# Altium PCB AHPR_Power_Management_and_Controls_Board_Unrouted.PcbDoc (part 1 of 2)
Units mil, origin at the board's own origin, x right, y up, seen from the top; angles counter-clockwise.
Board outline 2559.06 x 2204.72 mil, 2 copper layers (Top Layer, Bottom Layer); 89 components, 40 nets, 283 pads, 0 vias.
Unrouted connection lines stored in the file: 127.
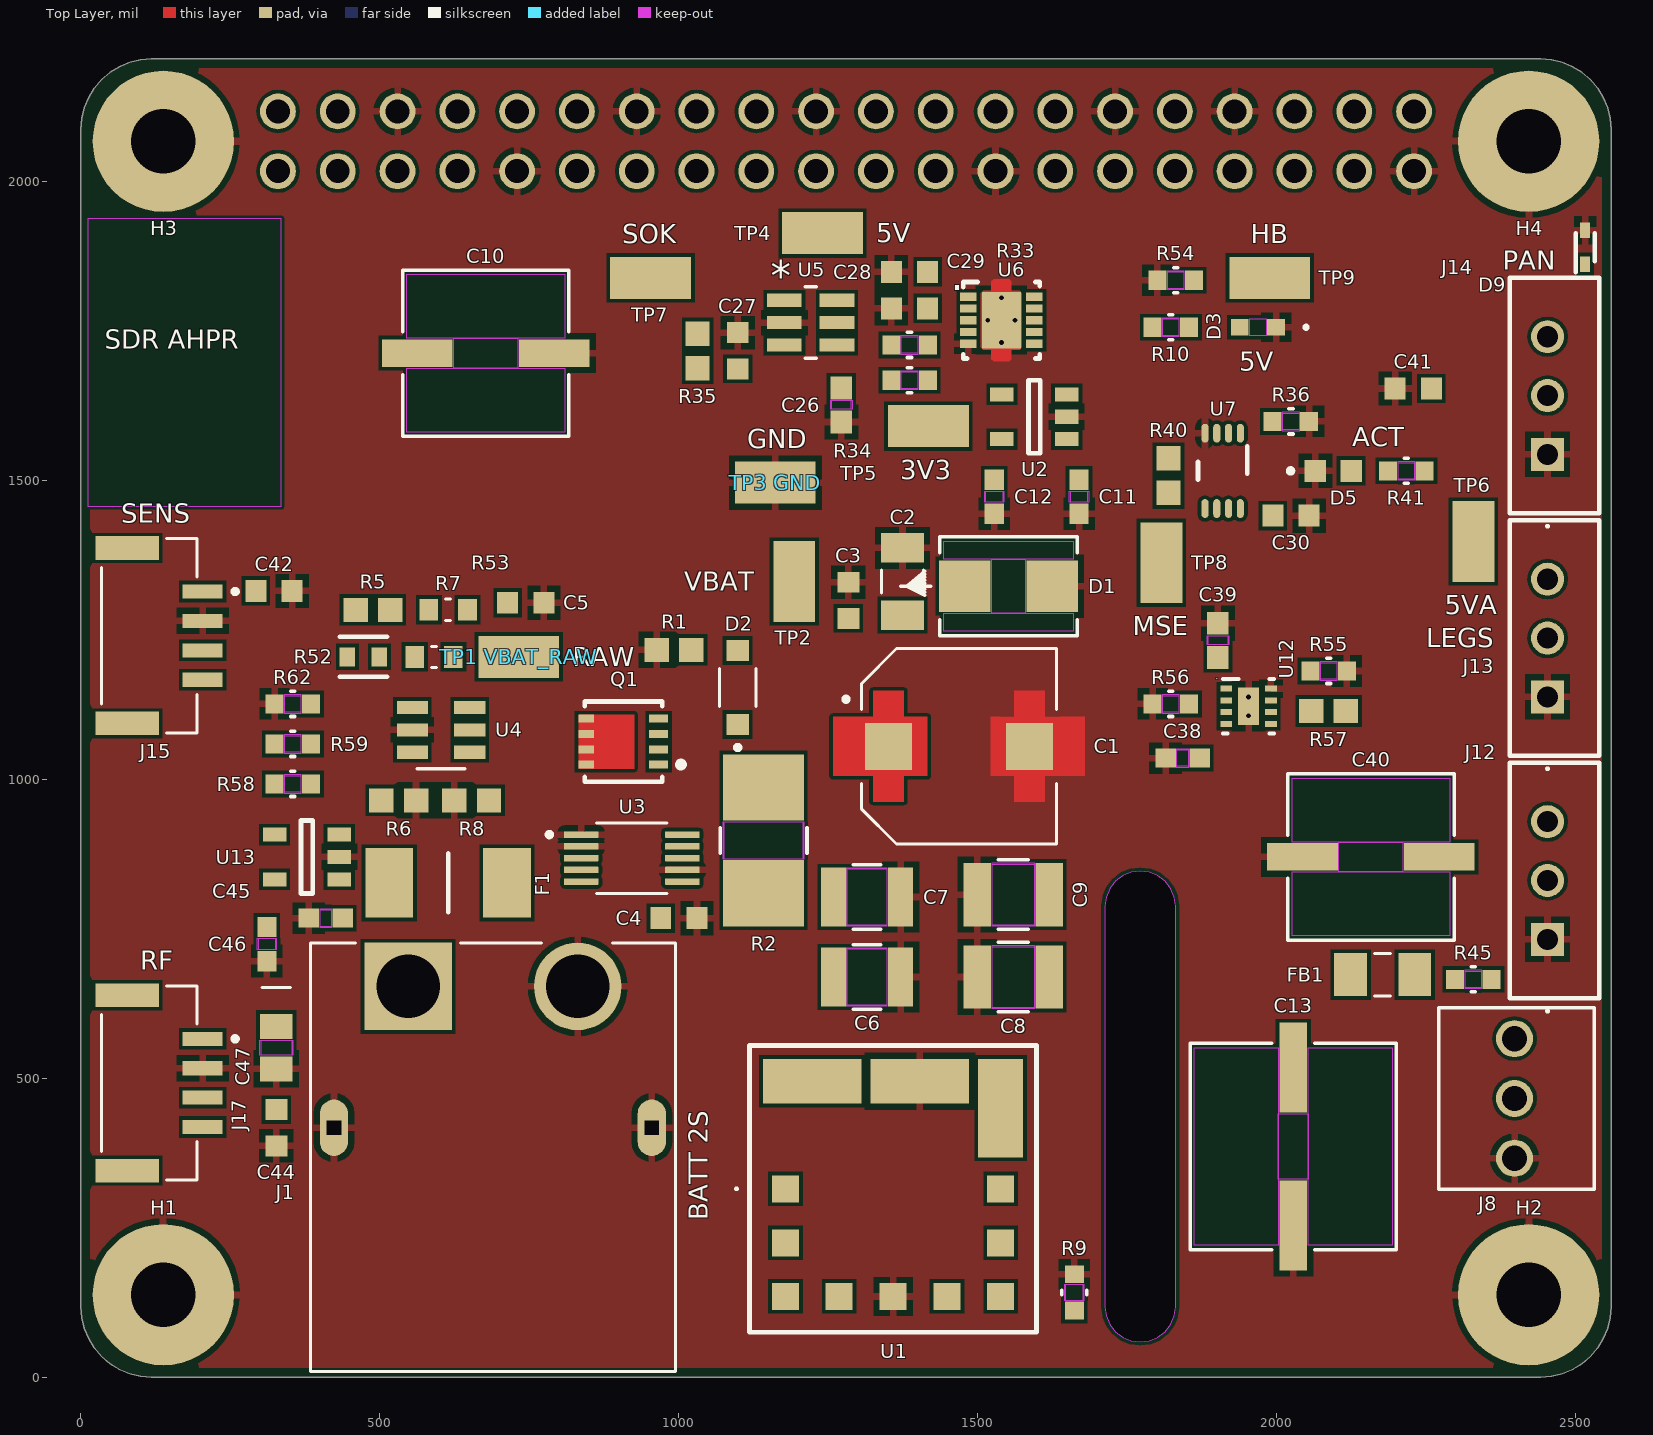
[diagram p0: Top Layer view]
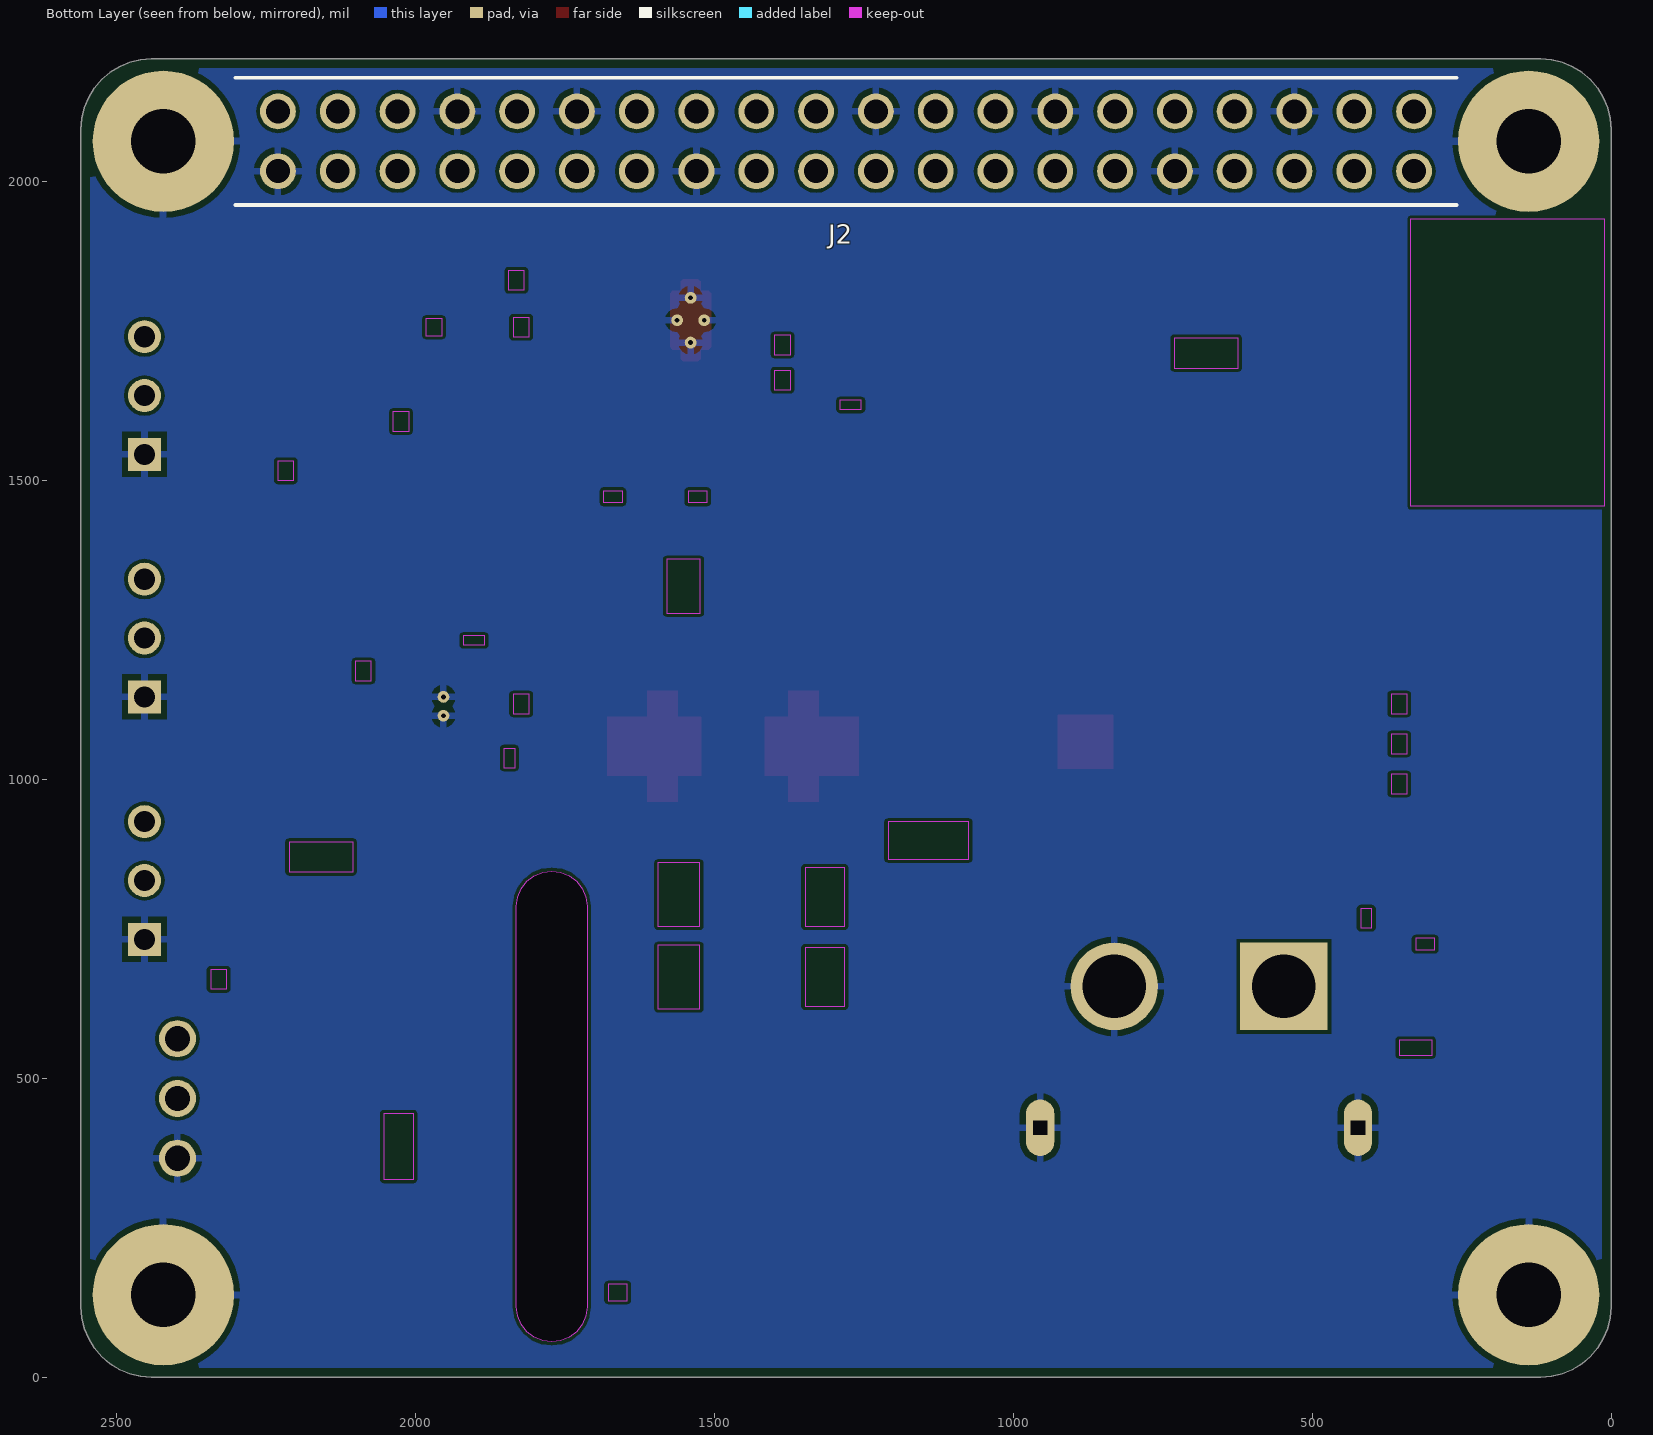
[diagram p1: Bottom Layer view, seen from below]

## Layer stack, top to bottom
Top Solder: solder mask 0.4, Solder Resist, Dk 3.5
Top Layer: signal copper 1.4
Dielectric 1: dielectric 12.6, FR-4, Dk 4.8
Bottom Layer: signal copper 1.4
Bottom Solder: solder mask 0.4, Solder Resist, Dk 3.5

## Board outline
0,118.11 1.45,99.63 5.78,81.61 12.87,64.49 22.56,48.69 34.59,34.59 48.68,22.56 64.49,12.87 81.61,5.78 99.63,1.45 118.11,0 2440.94,0 2459.42,1.45 2477.44,5.78 2494.57,12.87 2510.37,22.56 2524.46,34.59 2536.5,48.69 2546.18,64.49 2553.28,81.61 2557.6,99.63 2559.06,118.11 2559.06,2086.61 2557.6,2105.09 2553.28,2123.11 2546.18,2140.24 2536.5,2156.04 2524.46,2170.13 2510.37,2182.17 2494.57,2191.85 2477.44,2198.94 2459.42,2203.27 2440.94,2204.72 118.11,2204.72 99.63,2203.27 81.61,2198.94 64.49,2191.85 48.68,2182.17 34.59,2170.13 22.56,2156.04 12.87,2140.24 5.78,2123.11 1.45,2105.09 0,2086.61
cut-out: 1712.6,118.11 1714.61,102.83 1720.51,88.58 1729.89,76.35 1742.13,66.97 1756.37,61.07 1771.65,59.06 1786.94,61.07 1801.18,66.97 1813.41,76.35 1822.8,88.58 1828.7,102.83 1830.71,118.11 1830.71,787.4 1828.7,802.69 1822.8,816.93 1813.41,829.16 1801.18,838.54 1786.94,844.44 1771.65,846.46 1756.37,844.44 1742.13,838.54 1729.89,829.16 1720.51,816.93 1714.61,802.69 1712.6,787.4

## Design rules (kind name [scope] priority, off if disabled: settings)
Clearance Clearance_FootprintKeepouts [IsKeepOut And InAnyComponent vs IsPad And InAnyComponent] p1: gap=0.79 ignorepadtopadclearanceinfootprint=FALSE
Clearance [All] p2: gap=5.91 ignorepadtopadclearanceinfootprint=FALSE
HoleSize [All] p1: absolutevalues=TRUE maxlimit=137.8 minlimit=7.87 maxpercent=80.000 minpercent=20.000
MinimumSolderMaskSliver [All] p1: minsoldermaskwidth=4
PolygonConnect [All] p1: connectstyle=Relief reliefconductorwidth=11.81 reliefentries=4 polygonreliefangle="90 Angle" airgapwidth=10
RoutingVias [All] p1: holewidth=11.81 width=23.62 viastyle="Through Hole" minholewidth=11.81 minwidth=23.62 maxholewidth=11.81 maxwidth=23.62
SilkToSilkClearance [All] p1: silktosilkclearance=1.97
SilkToSolderMaskClearance [IsPad] p1: minsilkscreentomaskgap=2 clearancetoexposedcopper=TRUE
SolderMaskExpansion SolderMask_ViasTented [IsVia] p1: expansion=-11.81 istentingtop=FALSE
SolderMaskExpansion [All] p2: expansion=0.79 istentingtop=FALSE
SupplyNets "Schematic Supply Nets_7" [InNet('+5V')] p1: voltage=0.000
SupplyNets "Schematic Supply Nets_6" [InNet('+5V_SERVO')] p2: voltage=0.000
SupplyNets "Schematic Supply Nets_5" [InNet('+3V3_PI')] p3: voltage=0.000
SupplyNets "Schematic Supply Nets_4" [InNet('+5V_ACT')] p4: voltage=0.000
SupplyNets "Schematic Supply Nets_3" [InNet('+3V3_RF')] p5: voltage=0.000
SupplyNets "Schematic Supply Nets_2" [InNet('+3V3_LOGIC')] p6: voltage=0.000
SupplyNets "Schematic Supply Nets_1" [InNet('GND')] p7: voltage=0.000
SupplyNets "Schematic Supply Nets" [InNet('VBAT_PROTECTED')] p8: voltage=0.000
Width Width_POWER_HI [InNetClass('POWER_HI')] p1: maxlimit=118.11 minlimit=9.84 preferedwidth=39.37 minimp=50.000000 maximp=50.000000 favimp=50.000000
Width Width_POWER_LO [InNetClass('POWER_LO')] p2: maxlimit=59.06 minlimit=9.84 preferedwidth=15.75 minimp=50.000000 maximp=50.000000 favimp=50.000000
Width [All] p3: maxlimit=19.68 minlimit=5.91 preferedwidth=7.87 minimp=50.000000 maximp=50.000000 favimp=50.000000
26 further rules are at their usual default settings.

## Classes and differential pairs
net class POWER_LO: +3V3_LOGIC +3V3_PI +3V3_RF
net class POWER_HI: +5V +5V_ACT +5V_SERVO VBAT_IN VBAT_PROTECTED VBAT_RAW VBAT_SNS
component class Safety_Control: C26 C27 C28 C29 C30 R33 R34 R36 R40 R54 TP7 TP8 TP9 U5 U6 U7
component class Pi_Interface_and_IO: C42 C44 C45 C46 C47 H1 H2 H3 H4 J2 J15 J17 R58 R59 R62 U13
component class Battery_Input_and_Protection: C1 C2 C3 C4 C5 D1 D2 F1 J1 Q1 R1 R2 R5 R6 R7 R8 R35 R52 R53 "TP1 VBAT_RAW" TP2 "TP3 GND" U3 U4
component class Actuator_Power_and_Dynamixel_Bus: C13 C38 C39 C40 C41 D5 D9 FB1 J8 J12 J13 J14 R41 R45 R55 R56 R57 TP6 U12
component class 5V_and_3V3_Regulation: C6 C7 C8 C9 C10 C11 C12 D3 R9 R10 TP4 TP5 U1 U2

## Components (designator, comment, footprint, x,y, rotation, side; value= is the part's Value field where it differs from the comment)
C1 "220 µF" CAP_EEEFK1E221GV 1468.5,1055.12 r0 top
C2 "10 µF" CAPC3216X180N 1374.02,1330.71 r90 top
C3 "100 nF" CAPC1608X90N 1283.46,1299.21 r90 top
C4 "100 nF" CAPC1608X90N 1000,767.72 r0 top
C5 "100 nF" CAPC1608X90N 744.09,1295.28 r0 top
C6 "22 uF" G-32_MUR 1314.96,669.29 r0 top
C7 "22 uF" G-32_MUR 1314.96,803.15 r0 top
C8 "22 µF" CAP_GRM32ED_MUR 1559.06,669.29 r0 top
C9 "22 µF" CAP_GRM32ED_MUR 1559.06,807.09 r0 top
C10 "220 µF" CAP_EEFK_D_PAN 677.17,1712.6 r0 top
C11 "1 µF" G-188_MUR 1669.29,1472.44 r270 top
C12 "1 µF" G-188_MUR 1527.56,1472.44 r270 top
C13 "330 µF" CAP_EEFK_E_PAN 2027.56,385.83 r270 top
C26 "47 nF" YAG_CC0603_YAG 1271.65,1625.98 r90 top
C27 "100 nF" CAPC1608X90N 1098.43,1716.54 r270 top
C28 "100 nF" CAPC1608X90N 1385.83,1848.43 r0 top
C29 "DNP" CAPC1608X90N 1385.83,1787.4 r0 top
C30 "100 nF" CAPC1608X90N 2023.62,1440.94 r180 top
C38 "1 µF" G-188_MUR 1842.52,1035.43 r0 top
C39 "47 nF" YAG_CC0603_YAG 1901.57,1232.28 r90 top
C40 "220 µF" CAP_EEFK_D_PAN 2157.48,870.08 r180 top
C41 "100 nF" CAPC1608X90N 2228.35,1653.54 r0 top
C42 "100 nF" CAPC1608X90N 322.83,1314.96 r180 top
C44 "100 nF" CAPC1608X90N 326.77,417.32 r90 top
C45 "1 µF" G-188_MUR 409.45,767.72 r0 top
C46 "1 µF" G-188_MUR 311.02,724.41 r90 top
C47 "10 µF" CAP_GRM21_2p15X1p4X1p4_MUR 326.77,551.18 r90 top
D1 "9.0 V standoff" SMBJSeries_LTF 1551.18,1322.83 r0 top
D2 "12 V zener" DIO_BZT52C12-7-F 1098.43,1153.54 r90 top
D3 "Green LED" LED_LTST-C191KGKT_LTO 1968.5,1755.91 r180 top
D5 "AMBER LED" LEDC1608X55N 2094.49,1515.75 r0 top
D9 "DXL_DATA ESD DIODE" SODFL1608X77N 2515.75,1889.76 r90 top
F1 "5 A slow-blow, 2410" FUSC6127X294N 614.17,826.77 r0 top
FB1 "600 Ω" BEADC3216X180N 2177.17,673.23 r180 top
H1 "MH M2.5" MH_M2.5_PLATED 137.8,137.8 r0 top
H2 "MH M2.5" MH_M2.5_PLATED 2421.26,137.8 r0 top
H3 "MH M2.5" MH_M2.5_PLATED 137.8,2066.93 r0 top
H4 "MH M2.5" MH_M2.5_PLATED 2421.26,2066.93 r0 top
J1 "XT60 male, right-angle THT" AMASS_XT60PW-M 688.98,417.32 r0 top
J2 "Adafruit 1992 2×20 tall female" CONN_PRT-14017_SPK 329.53,2116.93 r0 bottom
J8 "Servo" CONN_A-6373-03A_MOL 2397.64,366.14 r90 top
J12 "DXL_IN from U2D2" B3BEHALFSN 2452.76,732.28 r90 top
J13 "Deployment (XL330 ID 1)" B3BEHALFSN 2452.76,1137.8 r90 top
J14 "Sensor package (XL330 ID 2)" B3BEHALFSN 2452.76,1543.31 r90 top
J15 "4-pin GH Sensor board" JST_SM04B-GHS-TB 129.92,1240.16 r270 top
J17 "4-pin GH RangeFinder" JST_SM04B-GHS-TB 129.92,492.13 r270 top
Q1 "P-ch, −30 V, 8.6 mΩ at −10 V, VGS ±25 V" INF-PG-TSDSON-8-2-V 905.51,1062.99 r180 top
R1 "10 kΩ" RESC1607X60N 992.13,1216.54 r0 top
R2 "10 mΩ" RES_2512_WSL 1141.73,897.64 r270 top
R5 "150 kΩ" RESC1607X60N 488.19,1283.46 r0 top
R6 "10 kΩ" RESC1607X60N 531.5,964.57 r0 top
R7 "210 kΩ" RESC1608X55N 614.17,1283.46 r0 top
R8 "10 kΩ" RESC1607X60N 653.54,964.57 r0 top
R9 "1.30 kΩ" RC0603N_YAG 1661.42,141.73 r90 top
R10 "2.2 kΩ" RC0603N_YAG 1822.83,1755.91 r180 top
R33 "0 Ω" RC0603N_YAG 1385.83,1726.38 r180 top
R34 "0 Ω" RC0603N_YAG 1385.83,1667.32 r180 top
R35 "10 kΩ" RESC1607X60N 1031.5,1716.54 r90 top
R36 "100 kΩ" RC0603N_YAG 2023.62,1598.43 r0 top
R40 "10 kΩ" RESC1607X60N 1818.9,1507.87 r90 top
R41 "1.5 kΩ" RC0603N_YAG 2216.54,1515.75 r180 top
R45 "100 Ω" RC0603N_YAG 2328.74,665.35 r180 top
R52 "20 kΩ" FP-RC0603-0_55-IPC_C 472.44,1204.72 r0 top
R53 "2.2 MΩ" RESC1608X55N 590.55,1204.72 r0 top
R54 "100 kΩ" RC0603N_YAG 1830.71,1834.65 r0 top
R55 "562 Ω" RC0603N_YAG 2086.61,1181.1 r0 top
R56 "100 kΩ" RC0603N_YAG 1822.83,1125.98 r0 top
R57 "10 kΩ" RESC1607X60N 2086.61,1114.17 r0 top
R58 "1 kΩ" RC0603N_YAG 354.33,992.13 r0 top
R59 "1 kΩ" RC0603N_YAG 354.33,1059.06 r0 top
R62 "100 kΩ" RC0603N_YAG 354.33,1125.98 r0 top
"TP1 VBAT_RAW" "5015" KEYSTONE_5015 732.28,1204.72 r0 top
TP2 "5015" KEYSTONE_5015 1192.91,1330.71 r90 top
"TP3 GND" "5015" KEYSTONE_5015 1161.42,1496.06 r0 top
TP4 "+5V" KEYSTONE_5015 1240.16,1913.39 r0 top
TP5 "+3V3_LOGIC" KEYSTONE_5015 1417.32,1590.55 r0 top
TP6 "+5V_ACT" KEYSTONE_5015 2328.74,1397.64 r90 top
TP7 "SAFE_OK" KEYSTONE_5015 952.76,1838.58 r0 top
TP8 "MOTOR_SAFE_EN" KEYSTONE_5015 1807.09,1362.2 r90 top
TP9 "HEARTBEAT" KEYSTONE_5015 1988.19,1838.58 r0 top
U1 "Buck Converter OKL-T_6-W12P-C" OKLT6W12PC 1358.27,314.96 r0 top
U2 "3.3 V 500 mA LDO" DBV0005A_N 1594.49,1606.3 r180 top
U3 "INA226AIDGSR" SOP50P490X110-10N 921.26,868.11 r0 top
U4 "TPS3700DDCR" DDC6_TEX 602.36,1082.68 r0 top
U5 "TPS3808G33DBVR_Supervisor" DBV6 1220.47,1763.78 r0 top
U6 "TPS3430WDRCR_Watchdog" DRC0010J 1539.37,1767.72 r0 top
U7 "SN74LVC1G74DCUR_Dflip-flop" DCU0008A_N 1909.45,1515.75 r270 top
U12 "TPS259530DSGR" DSG0008A 1952.76,1122.05 r0 top
U13 "3.3 V 500 mA LDO" DBV0005A_N 377.95,870.08 r180 top

## Footprints (in the part's own frame and the unit in brackets; to place one, negate y for a bottom-side part, rotate by r counter-clockwise, add the part's x,y. Pads: shape width x height; smd on the part's side, far side on the other; paste and mask are expansions set on the pad)
AMASS_XT60PW-M [mm]
  rect 3.716x3.716 / inner round 3.716 / far side rect 3.716x3.716 hole 2.7 mask+0.102: 1(-3.6,6)
  round 3.716 hole 2.7 mask+0.102: 2(3.6,6)
  oval 1.2x2.4 hole 0.6 square mask+0.102: SH1(-6.75,0) SH2(6.75,0)
  silkscreen extent -9.8,-10.35 7.75,7.85, body extent -7.75,-10.35 7.75,7.85, height 8.4
B3BEHALFSN [mm]
  rect 1.4x1.4 hole 0.9: 1(0,0)
  round 1.4 hole 0.9: 2(2.5,0) 3(5,0)
  silkscreen extent -3.1,-2.2 7.5,1.6, body extent -2.46,-2.29 7.54,1.51, height 6.1
BEADC3216X180N [mm]
  rect 1.4x1.82 smd: 1(-1.36,0) 2(1.36,0)
  silkscreen extent -0.34,-0.9 0.34,0.9, body extent -1.6,-0.84 1.6,0.76, height 1.61
CAP_EEEFK1E221GV [mm]
  rect 2x2 smd paste-2 mask+0: 1(-3,0) 2(3,0)
  Top Layer region: -2.35,1.25 -1.35,1.25 -1.35,-1.25 -2.35,-1.25 -2.35,-2.35 -3.65,-2.35 -3.65,-1.25 -5.35,-1.25 -5.35,1.25 -3.65,1.25 -3.65,2.35 -2.35,2.35
  Top Layer region: 3.65,1.25 5.35,1.25 5.35,-1.25 3.65,-1.25 3.65,-2.35 2.35,-2.35 2.35,-1.25 1.35,-1.25 1.35,1.25 2.35,1.25 2.35,2.35 3.65,2.35
  silkscreen extent -4.9,-4.15 4.15,4.15, body extent -4.85,-4.15 4.85,4.15, height 10.5
CAP_EEFK_D_PAN [mil]
  rect 118x46 smd paste+0 mask+0: 1(-114.5,0) 2(114.5,0)
  Top Layer keep-out region: -53.5,-25 -53.5,25 53.5,25 53.5,-25
  Top Layer keep-out region: -132,25 -132,132 132,132 132,25
  Top Layer keep-out region: -132,-132 -132,-25 132,-25 132,-132
  Keep-Out Layer region: -53.5,-25 -53.5,25 53.5,25 53.5,-25
  silkscreen extent -139,-139 139,139, body extent -154,-134 154,134, height 242
CAP_EEFK_E_PAN [mil]
  rect 150x46 smd paste+0 mask+0: 1(-132,0) 2(132,0)
  Top Layer keep-out region: -55,-25 -55,25 55,25 55,-25
  Top Layer keep-out region: -165.5,25 -165.5,165.5 165.5,165.5 165.5,25
  Top Layer keep-out region: -165.5,-165.5 -165.5,-25 165.5,-25 165.5,-165.5
  Keep-Out Layer region: -55,-25 -55,25 55,25 55,-25
  silkscreen extent -173,-173 173,173, body extent -187,-167 187,167, height 258
CAP_GRM21_2p15X1p4X1p4_MUR [mil]
  rect 42x55 smd paste+0 mask+0: 1(-35.5,0) 2(35.5,0)
  Top Layer keep-out region: -12.5,-25.5 -12.5,25.5 12.5,25.5 12.5,-25.5
  Keep-Out Layer region: -12.5,-27.5 -12.5,27.5 12.5,27.5 12.5,-27.5
  body extent -43,-27 43,27, height 55
CAP_GRM32ED_MUR [mil]
  rect 46x106 smd paste+0 mask+0: 1(-60,0) 2(60,0)
  Top Layer keep-out region: -35,-51 -35,51 35,51 35,-51
  Keep-Out Layer region: -35,-53 -35,53 35,53 35,-53
  silkscreen extent -25,-58 25,58, body extent -69,-53 69,53, height 106
CAPC1608X90N [mm]
  rect 0.89x0.93 smd: 1(-0.77,0) 2(0.77,0)
  body extent -0.8,-0.4 0.8,0.4, height 0.9
CAPC3216X180N [mm]
  rect 1.25x1.82 smd: 1(-1.43,0) 2(1.43,0)
  silkscreen extent -0.48,-0.9 0.48,0.9, body extent -1.6,-0.8 1.6,0.8, height 1.8
CONN_A-6373-03A_MOL [mil]
  round 62 / inner round 60 / far side round 62 hole 42 paste-99999 mask+0: 1(0,0) 2(100,0) 3(200,0)
  silkscreen extent -52,-133 252,127, body extent -47,-128 247,122, height 358
CONN_PRT-14017_SPK [mil]
  round 60 hole 40 paste-99999 mask+0: 1(0,100) 2(0,0) 3(100,100) 4(100,0) 5(200,100) 6(200,0) 7(300,100) 8(300,0) 9(400,100) 10(400,0) 11(500,100) 12(500,0) 13(600,100) 14(600,0) 15(700,100) 16(700,0) 17(800,100) 18(800,0) 19(900,100) 20(900,0) 21(1000,100) 22(1000,0) 23(1100,100) 24(1100,0) 25(1200,100) 26(1200,0) 27(1300,100) 28(1300,0) 29(1400,100) 30(1400,0) 31(1500,100) 32(1500,0) 33(1600,100) 34(1600,0) 35(1700,100) 36(1700,0) 37(1800,100) 38(1800,0) 39(1900,100) 40(1900,0)
  silkscreen extent -71,-56 1971,156, body extent -50,-48 1950,148, height 541
DBV0005A_N [mm]
  rect 1x0.6 smd paste+0 mask+0.051: 1(-1.375,0.95) 2(-1.375,0) 3(-1.375,-0.95) 4(1.375,-0.95) 5(1.375,0.95)
  silkscreen extent -0.25,-1.55 0.25,1.55
DBV6 [mil]
  rect 58x22 smd paste-29 mask-29: 1(-44,37.4) 2(-44,0) 3(-44,-37.4) 4(44,-37.4) 5(44,0) 6(44,37.4)
  silkscreen extent -9,-60 9,60, body extent -59,-60 59,60, height 57
DCU0008A_N [mm]
  oval 0.8x0.3 smd paste+0 mask+0.02: 1(-1.6,0.75) 2(-1.6,0.25) 3(-1.6,-0.25) 4(-1.6,-0.75) 5(1.6,-0.75) 6(1.6,-0.25) 7(1.6,0.25) 8(1.6,0.75)
  silkscreen extent -1.05,-1.05 0.38,1.05
DDC6_TEX [mil]
  rect 52x22 smd paste+0 mask+0: 1(-48,37.4) 2(-48,0) 3(-48,-37.4) 4(48,-37.4) 5(48,0) 6(48,37.4)
  silkscreen extent -40,-65 40,-65, body extent -60,-60 60,60, height 67
DIO_BZT52C12-7-F [mm]
  rect 0.9x0.95 smd paste+0 mask+0.102: 1(-1.575,0) 2(1.575,0)
  silkscreen extent -2.65,-0.77 0.81,0.77, body extent -1.85,-0.77 1.85,0.77, height 1.35
DRC0010J [mm]
  rect 0.7x0.35 smd paste-0.05 mask-0.051: 1(-1.4,1) 2(-1.4,0.5) 3(-1.4,0) 4(-1.4,-0.5) 5(-1.4,-1) 6(1.4,-1) 7(1.4,-0.5) 8(1.4,0) 9(1.4,0.5) 10(1.4,1)
  round 0.5 hole 0.203 paste-2539.97 mask+0: 11(-0.575,0) 11(0,-0.95) 11(0,0.95) 11(0.575,0)
  rect 1.65x2.4 smd paste-1.187 mask-1.181: 11(0,0)
  Top Layer region: -0.875,-1.15 -0.775,-1.25 -0.425,-1.25 -0.425,-1.65 -0.325,-1.75 -0.325,-1.75 -0.175,-1.75 -0.175,-1.75 -0.075,-1.65 -0.075,-1.25 0.075,-1.25 0.075,-1.65 0.175,-1.75 0.175,-1.75 0.325,-1.75 0.325,-1.75 0.425,-1.65 0.425,-1.25 0.775,-1.25 0.875,-1.15 0.875,1.15 0.775,1.25 0.425,1.25 0.425,1.65 0.325,1.75 0.175,1.75 0.075,1.65 0.075,1.25 -0.075,1.25 -0.075,1.65 -0.175,1.75 -0.325,1.75 -0.425,1.65 -0.425,1.25 -0.775,1.25 -0.875,1.15
  Top Layer region: -0.25,-1.1 -0.25,-1.75 0.25,-1.75 0.25,-1.1
  Top Layer region: -0.25,1.75 -0.25,1.1 0.25,1.1 0.25,1.75
  silkscreen extent -1.63,-1.63 1.63,1.63, body extent -1.5,-1.5 1.5,1.5, height 1
DSG0008A [mm]
  rect 0.5x0.25 smd paste+0 mask+0.051: 1(-0.95,0.75) 2(-0.95,0.25) 3(-0.95,-0.25) 4(-0.95,-0.75) 5(0.95,-0.75) 6(0.95,-0.25) 7(0.95,0.25) 8(0.95,0.75)
  round 0.5 / inner round 1.524 / far side round 0.5 hole 0.203 paste-2539.97 mask+0.076: 9(0,-0.4) 9(0,0.4)
  rect 0.9x1.6 smd paste-0.45 mask+0.051: 9(0,0)
  silkscreen extent -1.07,-1.15 1.07,1.15, body extent -1,-1 1,1, height 0.77
FP-RC0603-0_55-IPC_C [mil]
  rect 25.93x31.97 smd paste+0 mask+0: 1(-26.64,0) 2(26.64,0)
  silkscreen extent -40,-33 40,33, body extent -44,-22 44,22, height 10
FUSC6127X294N [mm]
  rect 2.02x2.95 smd: 1(-2.5,0) 2(2.5,0)
  silkscreen extent 0,-1.24 0,1.24, body extent -3.05,-1.35 3.05,1.35, height 2.94
G-32_MUR [mil]
  rect 42x98 smd paste+0 mask+0: 1(-56,0) 2(56,0)
  Top Layer keep-out region: -33,-47 -33,47 33,47 33,-47
  Keep-Out Layer region: -33,-49 -33,49 33,49 33,-49
  silkscreen extent -23,-54 23,54, body extent -63,-49 63,49, height 110
G-188_MUR [mil]
  rect 34x32 smd paste+0 mask+0: 1(-28.5,0) 2(28.5,0)
  Top Layer keep-out region: -9.5,-14 -9.5,14 9.5,14 9.5,-14
  Keep-Out Layer region: -9.5,-16 -9.5,16 9.5,16 9.5,-16
  body extent -31,-16 31,16, height 35
INF-PG-TSDSON-8-2-V [mm] "SON, SMD, 0.65 mm pitch, 8 pin, 3.3 mm L X 3.3 mm W X 1.10 mm H body"
  rect 0.8x0.34 smd paste-0.17 mask+0: 1(-1.537,0.975) 2(-1.537,0.325) 3(-1.537,-0.325) 4(-1.537,-0.975)
  rect 0.65x0.34 smd paste-0.17 mask+0.1: 5(1.538,-0.975) 6(1.538,-0.325) 7(1.538,0.325) 8(1.538,0.975)
  Top Layer region: 1.862,1.145 -0.498,1.145 -0.498,-1.145 1.862,-1.145
  silkscreen extent -2.61,-1.7 1.6,1.7, body extent -1.69,-1.65 1.61,1.65, height 1.01
JST_SM04B-GHS-TB [mm]
  rect 0.6x1.7 smd paste+0 mask+0.102: 1(-1.875,1.875) 2(-0.625,1.875) 3(0.625,1.875) 4(1.875,1.875)
  rect 1x2.7 smd paste+0 mask+0.102: MP1(-3.725,-1.325) MP2(3.725,-1.325)
  silkscreen extent -4.13,-2.42 4.13,3.35, body extent -4.13,-2.05 4.13,2.8, height 4.25
KEYSTONE_5015 [mm]
  rect 3.43x1.78 smd: TP(0,0)
  body extent -1.33,-0.51 1.33,0.51, height 1.52
LED_LTST-C191KGKT_LTO [mil]
  rect 30x28 smd paste+0 mask+0: 1(-30.5,0) 2(30.5,0)
  Top Layer keep-out region: -13.5,-14 -13.5,14 13.5,14 13.5,-14
  Keep-Out Layer region: -13.5,-14 -13.5,14 13.5,14 13.5,-14
  silkscreen extent -84,-3 -78,3, body extent -31,-16 31,16, height 22
LEDC1608X55N [mm]
  rect 0.91x0.93 smd: A(0.76,0) C(-0.76,0)
  silkscreen extent -1.91,-0.1 -1.72,0.1, body extent -0.8,-0.4 0.8,0.4, height 0.8
MH_M2.5_PLATED [mm]
  round 6 hole 2.75: 1(0,0)
OKLT6W12PC [mm]
  rect 1.145x1.145 smd: 1(-4.57,0) 5(4.57,0) 6(4.57,-4.57) 7(0,-4.57) 8(-2.29,-4.57) 9(-4.57,-4.57) 10(-4.57,-2.29) 11(4.57,-2.29) 12(2.29,-4.57)
  rect 4.19x1.905 smd: 2(-3.43,4.57) 3(1.14,4.57)
  rect 1.905x4.19 smd: 4(4.57,3.43)
  silkscreen extent -6.7,-6.09 6.09,6.09, body extent -6.09,-6.22 6.09,5.97, height 7.3
RC0603N_YAG [mil]
  rect 30x32 smd paste+0 mask+0: 1(-30.5,0) 2(30.5,0)
  Top Layer keep-out region: -13.5,-14 -13.5,14 13.5,14 13.5,-14
  Keep-Out Layer region: -13.5,-16 -13.5,16 13.5,16 13.5,-16
  silkscreen extent -3,-21 3,21, body extent -31,-16 31,16, height 28
RES_2512_WSL [mil]
  rect 110.78x135 smd paste+0 mask+0: 1(-88.39,0) 2(88.39,0)
  Top Layer keep-out region: -31,-65.5 -31,65.5 31,65.5 31,-65.5
  Keep-Out Layer region: -31,-67.5 -31,67.5 31,67.5 31,-67.5
  silkscreen extent -21,-72 21,72, body extent -130,-67 130,67, height 35
RESC1607X60N [mm]
  rect 1.04x1.02 smd: 1(-0.735,0) 2(0.735,0)
  body extent -0.8,-0.4 0.8,0.4, height 0.55
RESC1608X55N [mm]
  rect 0.79x0.93 smd: 1(-0.82,0) 2(0.82,0)
  silkscreen extent -0.11,-0.45 0.11,0.45, body extent -0.8,-0.4 0.8,0.4, height 0.55
SMBJSeries_LTF [mil]
  rect 86x86 smd paste+0 mask+0: 1(-73,0) 2(73,0)
  Top Layer keep-out region: -28,-45 -28,45 28,45 28,-45
  Top Layer keep-out region: -108,45 -108,75.5 108,75.5 108,45
  Top Layer keep-out region: -108,-75.5 -108,-45 108,-45 108,-75.5
  Keep-Out Layer region: -28,-45 -28,45 28,45 28,-45
  silkscreen extent -180,-82 115,82, body extent -110,-77 110,77, height 98
SODFL1608X77N [mm]
  rect 0.67x0.42 smd: 1(-0.725,0) 2(0.725,0)
  silkscreen extent -1.06,-0.4 0.6,0.4, body extent -0.8,-0.4 0.8,0.4, height 0.77
SOP50P490X110-10N [mm]
  rrect25% 1.47x0.28 smd: 1(-2.15,1) 2(-2.15,0.5) 3(-2.15,0) 4(-2.15,-0.5) 5(-2.15,-1) 6(2.15,-1) 7(2.15,-0.5) 8(2.15,0) 9(2.15,0.5) 10(2.15,1)
  silkscreen extent -3.6,-1.5 1.5,1.5, body extent -2.45,-1.5 2.45,1.5, height 1.1
YAG_CC0603_YAG [mil]
  rect 38x36 smd paste+0 mask+0: 1(-28.5,0) 2(28.5,0)
  Top Layer keep-out region: -7.5,-16 -7.5,16 7.5,16 7.5,-16
  Keep-Out Layer region: -7.5,-18 -7.5,18 7.5,18 7.5,-18
  body extent -34,-18 34,18, height 36

## Part data
C1: library part EEEFK1E221GV, "CAP ALUM 220UF 20% 25V SMD /  / EEEFK1E221GV /  / 220 µF 25 V, 160 mΩ ESR, SMD can /  / https://www.digikey.it/en/products/detail/panasonic-industry/EEE-FK1E221GV/10291405 /  / EEEFK1E221GV 220 µF 25 V, 160 mΩ ESR, SMD can", Package="RADIAL-2 Panasonic", Availability="In Stock", Check_prices=https://www.snapeda.com/parts/EEEFK1E221GV/Panasonic/view-part/?ref=eda, MF=Panasonic, MP=EEEFK1E221GV, Price=None, Purchase-URL=https://pricing.snapeda.com/search/part/EEEFK1E221GV/?ref=eda, SnapEDA_Link=https://www.snapeda.com/parts/EEEFK1E221GV/Panasonic/view-part/?ref=snap
C2: library part GRM31CR71E106KA12L, "SMD capacitor X7R(EIA) with capacitance 10uF Tol.10%. Rated voltage 25Vdc 125C /  / 10 µF 25 V X7R 1206 /  / GRM31CR71E106KA12L /  / https://octopart.com/part/murata/GRM31CR71E106KA12L?slid=404c199c-e740-4f3a-ac3d-8ed7f0d5c56c&ssid=37a7cfac-85e6-4eb9-ad27-42d001a336a3#CadModels", Package="1206 Murata", Check_prices=https://www.snapeda.com/parts/GRM31CR71E106KA12L/Murata+Electronics+North+America/view-part/?ref=eda, MF="Murata Electronics", MP=GRM31CR71E106KA12L, SnapEDA_Link=https://www.snapeda.com/parts/GRM31CR71E106KA12L/Murata+Electronics+North+America/view-part/?ref=snap
C3: library part GRM188R71H104KA93D, "SMD Capacitor X7R(EIA) with Capacitance: 0.10uF Tol. 10%. Rated Voltage: 50Vdc /  / 100 nF 50 V X7R 0603 /  / GRM188R71H104KA93D /  / https://octopart.com/part/murata/GRM188R71H104KA93D?slid=b13dff97-c438-4242-af73-a6dd7cbdd469&ssid=f8334882-7657-41cd-b7d6-fdf9f837711d#CadModels", Package="1608 Murata", Check_prices=https://www.snapeda.com/parts/GRM188R71H104KA93D/Murata/view-part/?ref=eda, MF=Murata, MP=GRM188R71H104KA93D, SnapEDA_Link=https://www.snapeda.com/parts/GRM188R71H104KA93D/Murata/view-part/?ref=snap
C4: library part GRM188R71E104KA01D, "SMD Capacitor X7R(EIA) with Capacitance: 0.10uF Tol. 10%. Rated Voltage: 25Vdc /  / 100 nF 25 V X7R 0603 /  / https://octopart.com/search?full_query=GRM188R71E104KA01D&q=GRM188R71E104KA01D&s=1", Package="1608 Murata", Check_prices=https://www.snapeda.com/parts/GRM188R71E104KA01D/Murata+Electronics+North+America/view-part/?ref=eda, MF="Murata Electronics", MP=GRM188R71E104KA01D, SnapEDA_Link=https://www.snapeda.com/parts/GRM188R71E104KA01D/Murata+Electronics+North+America/view-part/?ref=snap
C5: library part GRM188R71E104KA01D, "SMD Capacitor X7R(EIA) with Capacitance: 0.10uF Tol. 10%. Rated Voltage: 25Vdc /  / https://octopart.com/search?full_query=GRM188R71E104KA01D&q=GRM188R71E104KA01D&s=1", Package="1608 Murata", Check_prices=https://www.snapeda.com/parts/GRM188R71E104KA01D/Murata+Electronics+North+America/view-part/?ref=eda, MF="Murata Electronics", MP=GRM188R71E104KA01D, SnapEDA_Link=https://www.snapeda.com/parts/GRM188R71E104KA01D/Murata+Electronics+North+America/view-part/?ref=snap
C6 C7: library part GRM32ER71E226KE15L, "CAP, CERM, 22 uF, 25 V, +/- 10%, X7R, 1210 /  / Murata GRM32ER71E226KE15L /  / https://www.digikey.com/en/products/detail/murata-electronics/GRM32ER71E226KE15L/2039040", Manufacturer_Name=Murata, Copyright="Copyright (C) 2025 Ultra Librarian. All rights reserved.", Manufacturer_Part_Number=GRM32ER71E226KE15L
C8 C9: library part GRM32ER71A226KE20L, "Murata GRM32ER71A226KE20L / 22 µF 10 V X7R /  /  / https://www.digikey.com/en/products/detail/murata-electronics/GRM32ER71A226KE20L/586573", Manufacturer_Name=Murata, Copyright="Copyright (C) 2025 Ultra Librarian. All rights reserved.", Manufacturer_Part_Number=GRM32ER71A226KE20L
C10: library part EEE-FK0J221P, "Panasonic EEE-FK0J221P / 220 µF 6.3 V aluminum (total output C ≈ 734 µF, under the 1000 µF limit) /  / https://www.digikey.com/en/products/detail/panasonic-industry/EEE-FK0J221P/765937", Manufacturer_Name=Panasonic, Copyright="Copyright (C) 2026 Ultra Librarian. All rights reserved.", Manufacturer_Part_Number=EEE-FK0J221P
C11 C12: library part GRM188R71A105KA61D, "Murata GRM188R71A105KA61D / 1 µF 10 V X7R /  / https://www.digikey.com/en/products/detail/murata-electronics/GRM188R71A105KA61D/965913", Manufacturer_Name=Murata, Copyright="Copyright (C) 2025 Ultra Librarian. All rights reserved.", Manufacturer_Part_Number=GRM188R71A105KA61D
C13: library part EEE-FK0J331P, "Panasonic EEE-FK0J331P  / 330 µF 6.3 V aluminum (was 470 µF; reduced to keep U1 under 1000 µF) / SMD can / Servo bulk at J8 / https://www.digikey.com/en/products/result?keywords=EEE-FK0J331P", Manufacturer_Name=Panasonic, Copyright="Copyright (C) 2026 Ultra Librarian. All rights reserved.", Manufacturer_Part_Number=EEE-FK0J331P
C26: library part CC0603KRX7R9BB473, "Yageo CC0603KRX7R9BB473 / 47 nF 50 V X7R / 0603 / U5 CT delay: 47 nF / 175 nF + 0.5 ms ≈ 0.27 s / https://www.digikey.com/en/products/result?keywords=CC0603KRX7R9BB473", Manufacturer_Name=Yageo, Copyright="Copyright (C) 2026 Ultra Librarian. All rights reserved.", Manufacturer_Part_Number=CC0603KRX7R9BB473
C27: library part GRM188R71H104KA93D, "SMD Capacitor X7R(EIA) with Capacitance: 0.10uF Tol. 10%. Rated Voltage: 50Vdc / Murata GRM188R71H104KA93D / 100 nF 50 V X7R / 0603 / U5 supply / https://www.digikey.com/en/products/result?keywords=GRM188R71H104KA93D", Package="1608 Murata", Check_prices=https://www.snapeda.com/parts/GRM188R71H104KA93D/Murata/view-part/?ref=eda, MF=Murata, MP=GRM188R71H104KA93D, SnapEDA_Link=https://www.snapeda.com/parts/GRM188R71H104KA93D/Murata/view-part/?ref=snap
C28 C29: library part GRM188R71H104KA93D, "SMD Capacitor X7R(EIA) with Capacitance: 0.10uF Tol. 10%. Rated Voltage: 50VdcMurata GRM188R71H104KA93D / 100 nF 50 V X7R / 0603 / U6 supply / https://www.digikey.com/en/products/result?keywords=GRM188R71H104KA93D", Package="1608 Murata", Check_prices=https://www.snapeda.com/parts/GRM188R71H104KA93D/Murata/view-part/?ref=eda, MF=Murata, MP=GRM188R71H104KA93D, SnapEDA_Link=https://www.snapeda.com/parts/GRM188R71H104KA93D/Murata/view-part/?ref=snap
C30: library part GRM188R71H104KA93D, "SMD Capacitor X7R(EIA) with Capacitance: 0.10uF Tol. 10%. Rated Voltage: 50Vdc / Murata GRM188R71H104KA93D / 100 nF 50 V X7R / 0603 / U7 supply / https://www.digikey.com/en/products/result?keywords=GRM188R71H104KA93D", Package="1608 Murata", Check_prices=https://www.snapeda.com/parts/GRM188R71H104KA93D/Murata/view-part/?ref=eda, MF=Murata, MP=GRM188R71H104KA93D, SnapEDA_Link=https://www.snapeda.com/parts/GRM188R71H104KA93D/Murata/view-part/?ref=snap
C38: library part GRM188R71A105KA61D, "Murata GRM188R71A105KA61D / 1 µF 10 V X7R / 0603 / U12 input decoupling / https://octopart.com/search?q=GRM188R71A105KA61D", Manufacturer_Name=Murata, Copyright="Copyright (C) 2025 Ultra Librarian. All rights reserved.", Manufacturer_Part_Number=GRM188R71A105KA61D
C39: library part CC0603KRX7R9BB473, "Yageo CC0603KRX7R9BB473 / 47 nF 50 V X7R / 0603 / dVdt: about 0.9 V/ms, 6 ms ramp / https://www.digikey.com/en/products/result?keywords=CC0603KRX7R9BB473", Manufacturer_Name=Yageo, Copyright="Copyright (C) 2026 Ultra Librarian. All rights reserved.", Manufacturer_Part_Number=CC0603KRX7R9BB473
C40: library part EEE-FK0J221P, "Panasonic EEE-FK0J221P / 220 µF 6.3 V aluminum / SMD can / +5V_ACT bulk at J13/J14 / https://octopart.com/part/panasonic/EEE-FK0J221P", Manufacturer_Name=Panasonic, Copyright="Copyright (C) 2026 Ultra Librarian. All rights reserved.", Manufacturer_Part_Number=EEE-FK0J221P
C41: library part GRM188R71H104KA93D, "SMD Capacitor X7R(EIA) with Capacitance: 0.10uF Tol. 10%. Rated Voltage: 50Vdc / Murata GRM188R71H104KA93D / 100 nF 50 V X7R / 0603 / +5V_ACT decoupling at the connectors / https://www.digikey.com/en/products/result?keywords=GRM188R71H104KA93D", Package="1608 Murata", Check_prices=https://www.snapeda.com/parts/GRM188R71H104KA93D/Murata/view-part/?ref=eda, MF=Murata, MP=GRM188R71H104KA93D, SnapEDA_Link=https://www.snapeda.com/parts/GRM188R71H104KA93D/Murata/view-part/?ref=snap
C42 C44: library part GRM188R71H104KA93D, "SMD Capacitor X7R(EIA) with Capacitance: 0.10uF Tol. 10%. Rated Voltage: 50Vdc / Murata GRM188R71H104KA93D / 100 nF 50 V X7R / 0603 / Decoupling at J15 (+3V3_PI) and J17 (+3V3_RF) / https://www.digikey.com/en/products/result?keywords=GRM188R71H104KA93D", Package="1608 Murata", Check_prices=https://www.snapeda.com/parts/GRM188R71H104KA93D/Murata/view-part/?ref=eda, MF=Murata, MP=GRM188R71H104KA93D, SnapEDA_Link=https://www.snapeda.com/parts/GRM188R71H104KA93D/Murata/view-part/?ref=snap
C45 C46: library part GRM188R71A105KA61D, "GRM188R71A105KA61D /  / Murata GRM188R71A105KA61D / 1 µF 10 V X7R / 0603 / U13 input and output / https://octopart.com/search?q=GRM188R71A105KA61D", Manufacturer_Name=Murata, Copyright="Copyright (C) 2025 Ultra Librarian. All rights reserved.", Manufacturer_Part_Number=GRM188R71A105KA61D
C47: library part GRM21BR71A106KA73L, "Murata GRM21BR71A106KA73L (LCSC C117956) / 10 µF 10 V X7R / 0805 / Rangefinder bulk at J17, for laser pulse current / https://www.digikey.com/en/products/result?keywords=GRM21BR71A106KA73L", Manufacturer_Name=Murata, Copyright="Copyright (C) 2025 Ultra Librarian. All rights reserved.", Manufacturer_Part_Number=GRM21BR71A106KA73L, Type="Ceramic Capacitors"
D1: library part SMBJ9.0A, "SMBJ9.0A /  / 9.0 V standoff, SMB /  / https://www.digikey.ie/en/products/detail/littelfuse-inc/SMBJ9-0A/688270", Manufacturer_Name="Littelfuse Inc", Copyright="Copyright (C) 2025 Ultra Librarian. All rights reserved.", Manufacturer_Part_Number=SMBJ9.0A
D2: library part BZT52C12-7-F, "Zener Diode 12V 5.3% 500mW SOD123", Package="SOD-123 Fairchild Semiconductor", Check_prices=https://www.snapeda.com/parts/BZT52C12-7-F/Diodes+Inc./view-part/?ref=eda, MF="Diodes Inc.", MP=BZT52C12-7-F, SnapEDA_Link=https://www.snapeda.com/parts/BZT52C12-7-F/Diodes+Inc./view-part/?ref=snap
D3: library part LTST-C191KGKT, "Lite-On LTST-C191KGKT / Green LED / 0603 /  / https://www.digikey.com/en/products/detail/liteon/LTST-C191KGKT/386835", Manufacturer_Name=LITE-ON, Copyright="Copyright (C) 2025 Ultra Librarian. All rights reserved.", Manufacturer_Part_Number=LTST-C191KGKT, Type="LED Indication"
D5: library part LTST-C191KFKT, "Orange 605nm LED Indication - Discrete 2V 0603 (1608 Metric) / LTST-C191KFKT / Lite-On LTST-C191KFKT / Orange/amber 605 nm / 0603 / Actuator-rail-live indicator / https://www.digikey.com/en/products/detail/lite-on-inc/LTST-C191KFKT/386833", Package="0603 Lite-On", Availability="In Stock", Check_prices=https://www.snapeda.com/parts/LTST-C191KFKT/Lite-On+Inc./view-part/?ref=eda, MF="Lite-On Inc.", MP=LTST-C191KFKT, Price=None, Purchase-URL=https://pricing.snapeda.com/search/part/LTST-C191KFKT/?ref=eda, SnapEDA_Link=https://www.snapeda.com/parts/LTST-C191KFKT/Lite-On+Inc./view-part/?ref=snap
D9: library part TPD1E10B06DYAR, "ESD Suppressors / TVS Diodes 12-pF, +/-5.5V, +/-30-kV ESD protection diode in 0402 and SOD-523 package TPD1E10B06DYAR / TI TPD1E10B06DYAR / Bidirectional ESD diode, 6 V working / SOD-523 (DYA) / DXL_DATA ESD / https://www.digikey.com/en/products/detail/texas-instruments/TPD1E10B06DYAR/15853876", Manufacturer_Name="Texas Instruments", Mouser Part Number=595-TPD1E10B06DYAR, Arrow Part Number=TPD1E10B06DYAR, Arrow Price/Stock=https://www.arrow.com/en/products/tpd1e10b06dyar/texas-instruments.html?utm_currency=USD&region=nac, Datasheet Link=https://www.ti.com/lit/ds/symlink/tpd1e10b06.pdf?ts=1676259025619&ref_url=https%253A%252F%252Fwww.ti.com%252Fproduct%252FTPD1E10B06%252Fpart-details%252FTPD1E10B06DYAR, Geometry.Height=0.77mm, Manufacturer_Part_Number=TPD1E10B06DYAR, Mouser Price/Stock=https://www.mouser.co.uk/ProductDetail/Texas-Instruments/TPD1E10B06DYAR?qs=Rp5uXu7WBW9%2F66n97S3Kgw%3D%3D
F1: library part 0454005.MR, "Surface Mount Fuses 125VAC 5A .0136ohms 454 NANO2  Small size  Wide range of current rating available (0.375A to 12A)  Wide operating temperature range  RoHS compliant and Halogen Free  UL Recognized to UL/ CSA/NMX UL 248-1 and UL/CSA/NMX UL 248-14  Conforms to DENANs Appendix 3 /  / https://www.littelfuse.com/assetdocs/fuse-452-and-454-datasheet?assetguid=8C87AA93-80A7-4EA8-8749-A19BA03901C2", Manufacturer_Name=LITTELFUSE, Mouser Part Number=576-0454005.MR, Arrow Part Number=0454005.MR, Arrow Price/Stock=https://www.arrow.com/en/products/0454005.mr/littelfuse?region=nac, Datasheet Link=https://www.mouser.com/datasheet/2/240/media-3321648.pdf, Geometry.Height=2.94mm, Manufacturer_Part_Number=0454005.MR, Mouser Price/Stock=https://www.mouser.co.uk/ProductDetail/Littelfuse/0454005MR?qs=WtG364jHAdzqVvZG3rAI%2Fw%3D%3D
FB1: library part BLM31KN601SN1L, "600 Ohms @ 100MHz 1 Power Line Ferrite Bead 1206 _3216 Metric_ 2.9A 38mOhm / Murata BLM31KN601SN1L / 600 Ω at 100 MHz, 2.9 A, 38 mΩ /  / https://www.digikey.com/en/products/detail/murata-electronics/BLM31KN601SN1L/7564098", Package="3216 Murata", Availability=Unavailable, MF=Murata, MP=BLM31KN601SN1L, Price=None, SnapEDA_Link=https://www.snapeda.com/parts/BLM31KN601SN1L/Murata/view-part/4302166/?ref=snap
H1 H2 H3 H4: library part MOUNTING_HOLE_M2.5, "M2.5 mounting hole, Pi HAT pattern"
J1: library part XT60PW-M, "Socket, DC supply, male, PIN: 2 / https://octopart.com/part/amass/XT60PW-M", Package=Package, Check_prices=https://www.snapeda.com/parts/XT60PW-M/AMASS/view-part/?ref=eda, MF=AMASS, MP=XT60PW-M, SnapEDA_Link=https://www.snapeda.com/parts/XT60PW-M/AMASS/view-part/?ref=snap
J2: library part PRT-14017, "2×20 female, 2.54 mm, 13.5 mm body, THT, bottom side. / Adafruit 1992 2×20 tall female", Manufacturer_Name=Adafruit, Manufacturer_Part_Number=1992, Copyright="Copyright (C) 2026 Ultra Librarian. All rights reserved.", RefDes=RefDes, Type=Type
J8: library part 22232031, "KK 254 Solid Header, Vertical, with Friction Lock, 3 Circuits, Tin (Sn) Plating, Bag / Molex 22-23-2031 / 3-pin 2.54 mm KK, friction lock / THT, vertical / Servo (standard servo plug fits) / https://www.digikey.com/en/products/result?keywords=22-23-2031", Manufacturer_Name="Molex Connector Corporation", Copyright="Copyright (C) 2025 Ultra Librarian. All rights reserved.", Manufacturer_Part_Number=22232031, RefDes=RefDes, Type=Type
J12: library part B3B-EH-A__LF___SN_, "3 way 1 row top entry header,2.5mm pitch JST EH Series, 2.5mm Pitch 3 Way 1 Row Straight PCB Header, Solder Termination, 3A / JST B3B-EH-A(LF)(SN) / 3-pin EH, 2.5 mm, 3 A / THT, vertical / DXL_IN from the U2D2 (pin 2 VDD not connected) / https://www.digikey.com/en/products/result?keywords=B3B-EH-A / https://octopart.com/part/jst/B3B-EH-A%28LF%29%28SN%29?slid=a2ca3f22-0411-4852-8878-7eb0f241f67c&ssid=41117a84-245e-4aff-a845-413bdd9f3cb2#CadModels", Manufacturer_Name="JST (JAPAN SOLDERLESS TERMINALS)", Manufacturer_Part_Number="B3B-EH-A (LF) (SN)", Datasheet Link=http://www.jst-mfg.com/product/pdf/eng/eEH.pdf, Geometry.Height=6mm
J13: library part B3B-EH-A__LF___SN_, "3 way 1 row top entry header,2.5mm pitch JST EH Series, 2.5mm Pitch 3 Way 1 Row Straight PCB Header, Solder Termination, 3A / JST B3B-EH-A(LF)(SN) / 3-pin EH, 2.5 mm, 3 A / THT, vertical / ) / https://www.digikey.com/en/products/result?keywords=B3B-EH-A / https://octopart.com/part/jst/B3B-EH-A%28LF%29%28SN%29?slid=a2ca3f22-0411-4852-8878-7eb0f241f67c&ssid=41117a84-245e-4aff-a845-413bdd9f3cb2#CadModels", Manufacturer_Name="JST (JAPAN SOLDERLESS TERMINALS)", Manufacturer_Part_Number="B3B-EH-A (LF) (SN)", Datasheet Link=http://www.jst-mfg.com/product/pdf/eng/eEH.pdf, Geometry.Height=6mm
J14: library part B3B-EH-A__LF___SN_, "3 way 1 row top entry header,2.5mm pitch JST EH Series, 2.5mm Pitch 3 Way 1 Row Straight PCB Header, Solder Termination, 3A / JST B3B-EH-A(LF)(SN) / 3-pin EH, 2.5 mm, 3 A / THT, vertical /  / https://www.digikey.com/en/products/result?keywords=B3B-EH-A / https://octopart.com/part/jst/B3B-EH-A%28LF%29%28SN%29?slid=a2ca3f22-0411-4852-8878-7eb0f241f67c&ssid=41117a84-245e-4aff-a845-413bdd9f3cb2#CadModels", Manufacturer_Name="JST (JAPAN SOLDERLESS TERMINALS)", Manufacturer_Part_Number="B3B-EH-A (LF) (SN)", Datasheet Link=http://www.jst-mfg.com/product/pdf/eng/eEH.pdf, Geometry.Height=6mm
J15: library part SM04B-GHS-TB, "Connector Header Surface Mount, Right Angle 4 position 0.049 (1.25mm) / JST SM04B-GHS-TB(LF)(SN) / 4-pin GH, 1.25 mm / Right-angle SMD, 2 mounting tabs / Sensor board: +3V3_PI, GND, SDA, SCL / https://www.digikey.com/en/products/result?keywords=SM04B-GHS-TB", Package=None, Check_prices=https://www.snapeda.com/parts/SM04B-GHS-TB/JST/view-part/?ref=eda, MF="JST Sales", MP=SM04B-GHS-TB, SnapEDA_Link=https://www.snapeda.com/parts/SM04B-GHS-TB/JST/view-part/?ref=snap
J17: library part SM04B-GHS-TB, "Connector Header Surface Mount, Right Angle 4 position 0.049 (1.25mm) / JST SM04B-GHS-TB(LF)(SN) / 4-pin GH, 1.25 mm / Right-angle SMD, 2 mounting tabs / Rangefinder: +3V3_RF, GND, RF_TX, RF_RX / https://www.digikey.com/en/products/result?keywords=SM04B-GHS-TB", Package=None, Check_prices=https://www.snapeda.com/parts/SM04B-GHS-TB/JST/view-part/?ref=eda, MF="JST Sales", MP=SM04B-GHS-TB, SnapEDA_Link=https://www.snapeda.com/parts/SM04B-GHS-TB/JST/view-part/?ref=snap
Q1: library part "BSZ086P03NS3 G", "Insulated-Gate Field-Effect Transistor (IGFET), P-Channel, Enhancement, Body Diode, Pin 1 Source, 2 Source, 3 Source, 4 Gate, 5 Drain, 6 Drain, 7 Drain, 8 Drain, 8 Pins /  / BSZ086P03NS3 G /  / https://www.digikey.com/en/products/detail/infineon-technologies/BSZ086P03NS3GATMA1/2080736", Manufacturer="Infineon Technologies", Manufacturer Order Number="BSZ086P03NS3 G", PackageReference=PG-DSO-8-902
R1 R8: library part RC0603FR-0710KL, "10 kOhms Â±1% 0.1W, 1/10W Chip Resistor 0603 (1608 Metric) Moisture Resistant Thick Film /  / 10 kΩ 1 % 0603 /  / https://octopart.com/part/yageo-group/RC0603FR-0710KL?slid=54dab893-c3ad-4fe4-85ee-8bc12f36e62a&ssid=b3dacb3c-e3ba-451e-bc50-2e154119b6bd#CadModels", Package="0603 Yageo", Check_prices=https://www.snapeda.com/parts/RC0603FR-0710KL/Yageo/view-part/?ref=eda, MF=Yageo, MP=RC0603FR-0710KL, SnapEDA_Link=https://www.snapeda.com/parts/RC0603FR-0710KL/Yageo/view-part/?ref=snap
R2: library part WSL2512R0100FEA, "WSL-2512 .01 1% EA e3 /  / WSL2512R0100FEA 10 mΩ 1 % 1 W, 2512 /  / https://www.digikey.com/en/products/detail/vishay-dale/WSL2512R0100FEA/712561", Manufacturer_Name=Vishay, Copyright="Copyright (C) 2026 Ultra Librarian. All rights reserved.", Manufacturer_Part_Number=WSL2512R0100FEA
R5: library part RC0603FR-07150KL, "150 kOhms Â±1% 0.1W, 1/10W Chip Resistor 0603 (1608 Metric) Moisture Resistant Thick Film /  / 150 kΩ 1 % 0603 /  / Yageo RC0603FR-07150KL /  / https://octopart.com/part/yageo-group/RC0603FR-07150KL?slid=7267a52b-5458-460d-b3af-5cbc9f622783&ssid=8a1663fd-86ca-479a-af6d-7d8843a17d84#CadModels", Package="0603 Yageo", Check_prices=https://www.snapeda.com/parts/RC0603FR-07150KL/Yageo/view-part/?ref=eda, MF=Yageo, MP=RC0603FR-07150KL, SnapEDA_Link=https://www.snapeda.com/parts/RC0603FR-07150KL/Yageo/view-part/?ref=snap
R6 R35: library part RC0603FR-0710KL, "10 kOhms Â±1% 0.1W, 1/10W Chip Resistor 0603 (1608 Metric) Moisture Resistant Thick Film /  / 10 kΩ 1 % 0603 /  / Yageo RC0603FR-07150KL /  / https://octopart.com/search?full_query=RC0603FR-0710KL&q=RC0603FR-0710KL&s=1", Package="0603 Yageo", Check_prices=https://www.snapeda.com/parts/RC0603FR-0710KL/Yageo/view-part/?ref=eda, MF=Yageo, MP=RC0603FR-0710KL, SnapEDA_Link=https://www.snapeda.com/parts/RC0603FR-0710KL/Yageo/view-part/?ref=snap
R7: library part RC0603FR-07210KL, "210 kOhms Â±1% 0.1W, 1/10W Chip Resistor 0603 (1608 Metric) Moisture Resistant Thick Film /  / RC0603FR-07210KL /  / 210 kΩ / 10 kΩ 1 % /  / RC0603FR-07210KL /  / https://octopart.com/part/yageo-group/RC0603FR-07210KL?slid=d7ce36d7-8a58-4921-8373-64f65502f445&ssid=0484fa2a-abbb-4bdb-98e9-479695faa21c#CadModels", Package="1608 Yageo", Check_prices=https://www.snapeda.com/parts/RC0603FR-07210KL/Yageo/view-part/?ref=eda, MF=Yageo, MP=RC0603FR-07210KL, SnapEDA_Link=https://www.snapeda.com/parts/RC0603FR-07210KL/Yageo/view-part/?ref=snap
R9: library part RT0603BRD071K3L, "Yageo RT0603BRD071K3L / 1.30 kΩ 0.1 % thin film (Murata asks ≤ 0.5 %, ≤ 100 ppm/°C) / 0603 / Output trim, 5.14 V / https://www.digikey.com/en/products/result?keywords=RT0603BRD071K3L", Manufacturer_Name=Yageo, Copyright="Copyright (C) 2026 Ultra Librarian. All rights reserved.", Manufacturer_Part_Number=RT0603BRD071K3L
R10: library part RC0603FR-072K2L, "RC0603FR-072K2L / 2.2 kΩ 1 % (~7 mW in D3) / 0603 /  / https://www.digikey.com/en/products/detail/yageo/RC0603FR-072K2L/727016", Manufacturer_Name=Yageo, Copyright="Copyright (C) 2025 Ultra Librarian. All rights reserved.", Manufacturer_Part_Number=RC0603FR-072K2L
R33 R34: library part RC0603JR-070RL, "RES SMD 0 OHM 1% JUMPER 1/10W 0603 / 0 Ω / https://www.digikey.com/en/products/category/resistors/2?s=N4IgTCBcDaIEoGEAMA2JBmAUnAtEg7EnADIgC6AvkA", Manufacturer_Name=Yageo, Copyright="Copyright (C) 2025 Ultra Librarian. All rights reserved.", Manufacturer_Part_Number=RC0603JR-070RL
R36: library part RC0603FR-07100KL, "RES, 100 k, 1%, 0.1 W, 0603 / Yageo RC0603FR-07100KL / 100 kΩ 1 % / 0603 / MOTOR_ARM pulldown / https://www.digikey.com/en/products/result?keywords=RC0603FR-07100KL", Manufacturer_Name=Yageo, Copyright="Copyright (C) 2025 Ultra Librarian. All rights reserved.", Manufacturer_Part_Number=RC0603FR-07100KL
R40: library part RC0603FR-0710KL, "10 kOhms Â±1% 0.1W, 1/10W Chip Resistor 0603 (1608 Metric) Moisture Resistant Thick Film / Yageo RC0603FR-0710KL / 10 kΩ 1 % / 0603 / Series to Pi on MOTOR_SAFE_EN status / https://www.digikey.com/en/products/result?keywords=RC0603FR-0710KL", Package="0603 Yageo", Check_prices=https://www.snapeda.com/parts/RC0603FR-0710KL/Yageo/view-part/?ref=eda, MF=Yageo, MP=RC0603FR-0710KL, SnapEDA_Link=https://www.snapeda.com/parts/RC0603FR-0710KL/Yageo/view-part/?ref=snap
R41: library part RC0603FR-0715KL, "RES SMD 15K OHM 1% 1/10W 0603 / Yageo RC0603FR-071K5L / 1.5 kΩ 1 % / 0603 / D5 current: (5.14 − 2.0) / 1.5 kΩ ≈ 2.1 mA / https://www.digikey.com/en/products/result?keywords=RC0603FR-071K5L", Manufacturer_Name=Yageo, Copyright="Copyright (C) 2026 Ultra Librarian. All rights reserved.", Manufacturer_Part_Number=RC0603FR-0715KL
R45: library part RC0603FR-07100RL, "Yageo RC0603FR-07100RL / 100 Ω 1 % / 0603 / Servo PWM series / https://www.digikey.com/en/products/result?keywords=RC0603FR-07100RL", Manufacturer_Name=Yageo, Copyright="Copyright (C) 2026 Ultra Librarian. All rights reserved.", Manufacturer_Part_Number=RC0603FR-07100RL
R52: library part CMP-2000-06932-2, "RES 20K OHM 1% 1/10W 0603 / 20 kOhms Â±1% 0.1W, 1/10W Chip Resistor 0603 (1608 Metric) Moisture Resistant Thick Film /  / SMD-RES-20K-1%-1/10W(0603) /  / https://octopart.com/part/yageo-group/RC0603FR-0720KL?slid=9dd42130-19c2-4799-ac31-5afd2b72cd34&ssid=b984c5c9-64c8-4793-b112-fa8b90893e5e#CadModels", Case Code (Imperial)=0603, Case Code (Metric)=1608, Max Operating Temperature=155°C, Max Power Dissipation=100mW, Min Operating Temperature=-55°C, Package Quantity=1, Resistance=20kR, Resistance Tolerance=1%, Resistor Type="Thick Film", Temperature Coefficient=100ppm/°C, Voltage Rating=50V, Case/Package=0603, Construction=Rectangular, Depth=0.8mm, Features="Moisture Resistant", Height=0.022inch, Lead Free="Lead Free", Length=0.063inch, Military Standard=Not, Number of Pins=2, Number of Terminations=2, Packaging="Tape and Reel", Power Rating=100mW, REACH SVHC="No SVHC", RoHS Compliant=Yes, Series=RC, Size Code=0603, Technology="THICK FILM", Termination=SMD/SMT, Tolerance=1%, Voltage Rating (DC)=50V, Width=0.031inch
R53: library part RC0603FR-072M2L, "Äiá»‡n trá»Ÿ mÃ ng dÃ y gáº¯n bá» máº·t, DÃ²ng RC, 2,2 Mohm, 100 mW, - 1%, 50 V, 0603 [1608 Metric] /  / RC0603FR-072M2L /  / https://octopart.com/part/yageo-group/RC0603FR-072M2L?slid=d71ab9d8-a679-4832-96ed-b1c44a9cfdb9&ssid=0251966b-910a-4a6a-9854-0248babda200#CadModels", Package="1608 Yageo", Check_prices=https://www.snapeda.com/parts/RC0603FR-072M2L/Yageo/view-part/?ref=eda, MF=Yageo, MP=RC0603FR-072M2L, SnapEDA_Link=https://www.snapeda.com/parts/RC0603FR-072M2L/Yageo/view-part/?ref=snap
R54: library part RC0603FR-07100KL, "RES, 100 k, 1%, 0.1 W, 0603 / Yageo RC0603FR-07100KL / 100 kΩ 1 % / 0603 / HEARTBEAT pulldown: TI says WDI must never float, and the Pi pin is Hi-Z while it boots / https://www.digikey.com/en/products/result?keywords=RC0603FR-07100KL", Manufacturer_Name=Yageo, Copyright="Copyright (C) 2025 Ultra Librarian. All rights reserved.", Manufacturer_Part_Number=RC0603FR-07100KL
R55: library part RC0603FR-07562RL, "Yageo RC0603FR-07562RL / 562 Ω 1 % / 0603 / ILM: I_LIM = 2000 / 562 + 0.04 ≈ 3.6 A (verify equation) / https://www.digikey.com/en/products/result?keywords=RC0603FR-07562RL", Manufacturer_Name=Yageo, Copyright="Copyright (C) 2026 Ultra Librarian. All rights reserved.", Manufacturer_Part_Number=RC0603FR-07562RL
R56: library part RC0603FR-07100KL, "RES, 100 k, 1%, 0.1 W, 0603 / Yageo RC0603FR-07100KL / 100 kΩ 1 % / 0603 / U12 EN pulldown: actuators off by default / https://www.digikey.com/en/products/result?keywords=RC0603FR-07100KL", Manufacturer_Name=Yageo, Copyright="Copyright (C) 2025 Ultra Librarian. All rights reserved.", Manufacturer_Part_Number=RC0603FR-07100KL
R57: library part RC0603FR-0710KL, "10 kOhms Â±1% 0.1W, 1/10W Chip Resistor 0603 (1608 Metric) Moisture Resistant Thick Film / Yageo RC0603FR-0710KL / 10 kΩ 1 % / 0603 / FLT pull-up to +3V3_PI (ACT_FAULT_n) / https://www.digikey.com/en/products/result?keywords=RC0603FR-0710KL", Package="0603 Yageo", Check_prices=https://www.snapeda.com/parts/RC0603FR-0710KL/Yageo/view-part/?ref=eda, MF=Yageo, MP=RC0603FR-0710KL, SnapEDA_Link=https://www.snapeda.com/parts/RC0603FR-0710KL/Yageo/view-part/?ref=snap
R58 R59: library part RC0603FR-071KL, "RES SMD 1K OHM 1% 1/10W 0603 / Yageo RC0603FR-071KL / 1 kΩ 1 % / 0603 / UART series to the rangefinder: limits back-feed into its pins while it is unpowered / https://www.digikey.com/en/products/result?keywords=RC0603FR-071KL", Manufacturer_Name=Yageo, Copyright="Copyright (C) 2025 Ultra Librarian. All rights reserved.", Manufacturer_Part_Number=RC0603FR-071KL
R62: library part RC0603FR-07100KL, "RES, 100 k, 1%, 0.1 W, 0603 / Yageo RC0603FR-07100KL / 100 kΩ 1 % / 0603 / RF_POWER_EN pulldown: rangefinder off at boot / https://www.digikey.com/en/products/result?keywords=RC0603FR-07100KL", Manufacturer_Name=Yageo, Copyright="Copyright (C) 2025 Ultra Librarian. All rights reserved.", Manufacturer_Part_Number=RC0603FR-07100KL
"TP1 VBAT_RAW" TP2 "TP3 GND": "Test Point Micro Mini SMT Phos Bronze/Silver 1000pc Tape & Reel", Package=None, Check_prices=https://www.snapeda.com/parts/5015/Keystone/view-part/?ref=eda, MF="Keystone Electronics", MP=5015, SnapEDA_Link=https://www.snapeda.com/parts/5015/Keystone/view-part/?ref=snap
TP4 TP5 TP6 TP7 TP8 TP9: library part 5015, "Test Point Micro Mini SMT Phos Bronze/Silver 1000pc Tape & Reel", Package=None, Check_prices=https://www.snapeda.com/parts/5015/Keystone/view-part/?ref=eda, MF="Keystone Electronics", MP=5015, SnapEDA_Link=https://www.snapeda.com/parts/5015/Keystone/view-part/?ref=snap
U1: library part OKL-T_6-W12P-C, "MURATA POWER SOLUTIONS - OKL-T/6-W12P-C - DC-DC CONVERTER, 0.591V TO 5.5V, MODULE", Arrow Part Number=OKL-T/6-W12P-C, Manufacturer_Name="Murata Electronics", Mouser Part Number=580-OKL-T/6-W12P-C, Arrow Price/Stock=https://www.arrow.com/en/products/okl-t6-w12p-c/murata-power-solutions?region=nac, Datasheet Link=https://www.murata.com/products/productdata/8807038255134/okl-t6-w12.pdf?1583754815000, Geometry.Height=7.2mm, Manufacturer_Part_Number=OKL-T/6-W12P-C, Mouser Price/Stock=https://www.mouser.co.uk/ProductDetail/Murata-Power-Solutions/OKL-T-6-W12P-C?qs=CxV9Ey7RZVdXGDAP%2FweYNg%3D%3D
U2: library part TLV75533PDBVR, "500mA high-PSRR low-I<sub>Q</sub> low-dropout voltage regulator with enable 5-SOT-23 -40 to 125 / TI TLV75533PDBVR / 3.3 V 500 mA LDO /  / https://www.digikey.com/en/products/detail/texas-instruments/TLV75533PDBVR/9356541", Manufacturer_Name="Texas Instruments", Copyright="Copyright (C) 2026 Ultra Librarian. All rights reserved.", Manufacturer_Part_Number=TLV75533PDBVR, RefDes=RefDes, Type=TYPE
U3: "36V, 16-bit, ultra-precise i2c output current/voltage/power monitor w/alert", Package="VSSOP-10 Texas Instruments", Check_prices=https://www.snapeda.com/parts/INA226AIDGSR/Texas+Instruments/view-part/?ref=eda, MF="Texas Instruments", MP=INA226AIDGSR, SnapEDA_Link=https://www.snapeda.com/parts/INA226AIDGSR/Texas+Instruments/view-part/?ref=snap
U4: "High-voltage (18-V) window voltage detector for overvoltage and undervoltage monitoring 6-SOT-23-THIN -40 to 125", Manufacturer_Name="Texas Instruments", Copyright="Copyright (C) 2026 Ultra Librarian. All rights reserved.", Manufacturer_Part_Number=TPS3700DDCR, RefDes=RefDes, Type=Type
U5: library part TPS3808G33DBVR, "Low-quiescent current supervisor with programmable delay & manual reset 6-SOT-23 -40 to 125", Manufacturer_Name="Texas Instruments", Copyright="Copyright (C) 2025 Ultra Librarian. All rights reserved.", Manufacturer_Part_Number=TPS3808G33DBVR, RefDes=RefDes, Type=Type
U6: library part TPS3430WDRCR, "Window watchdog timer with programmable reset delay 10-VSON -40 to 125", Manufacturer_Name="Texas Instruments", Copyright="Copyright (C) 2026 Ultra Librarian. All rights reserved.", Manufacturer_Part_Number=TPS3430WDRCR, RefDes=RefDes, Type=TYPE
U7: library part SN74LVC1G74DCUR, "Single Positive-Edge-Triggered D-Type Flip-Flop With Clear and Preset 8-VSSOP -40 to 125", Alternate_PartNumber=SN74LVC1G74DCUT, Manufacturer="Texas Instruments", CompType=IC, Copyright="Copyright (C) 2026 Ultra Librarian. All rights reserved.", Manufacturer_Name="Texas Instruments", Manufacturer_Part_Number=SN74LVC1G74DCUR, MountType=SMT, PackageReference=DCU0008A, PartNumber=SN74LVC1G74DCUR, RefDes=RefDes, RoHS=Y, Type=TYPE
U12: "2.7-V to 18-V, 34m&Omega;, 0.5-4A eFuse with over voltage protection in small WSON package 8-WSON -40 to 125", Manufacturer_Name="Texas Instruments", Copyright="Copyright (C) 2025 Ultra Librarian. All rights reserved.", Manufacturer_Part_Number=TPS259530DSGR, RefDes=RefDes, Type=TYPE